# Altium PCB Стенд проверки шлейфов.PcbDoc (part 3 of 3)
Units mm, origin at the board's own origin, x right, y up, seen from the top; angles counter-clockwise.
Board outline 130 x 70 mm, 2 copper layers (Top Layer, Bottom Layer), stack 1.571 mm thick; 262 components, 230 nets, 835 pads, 564 vias.
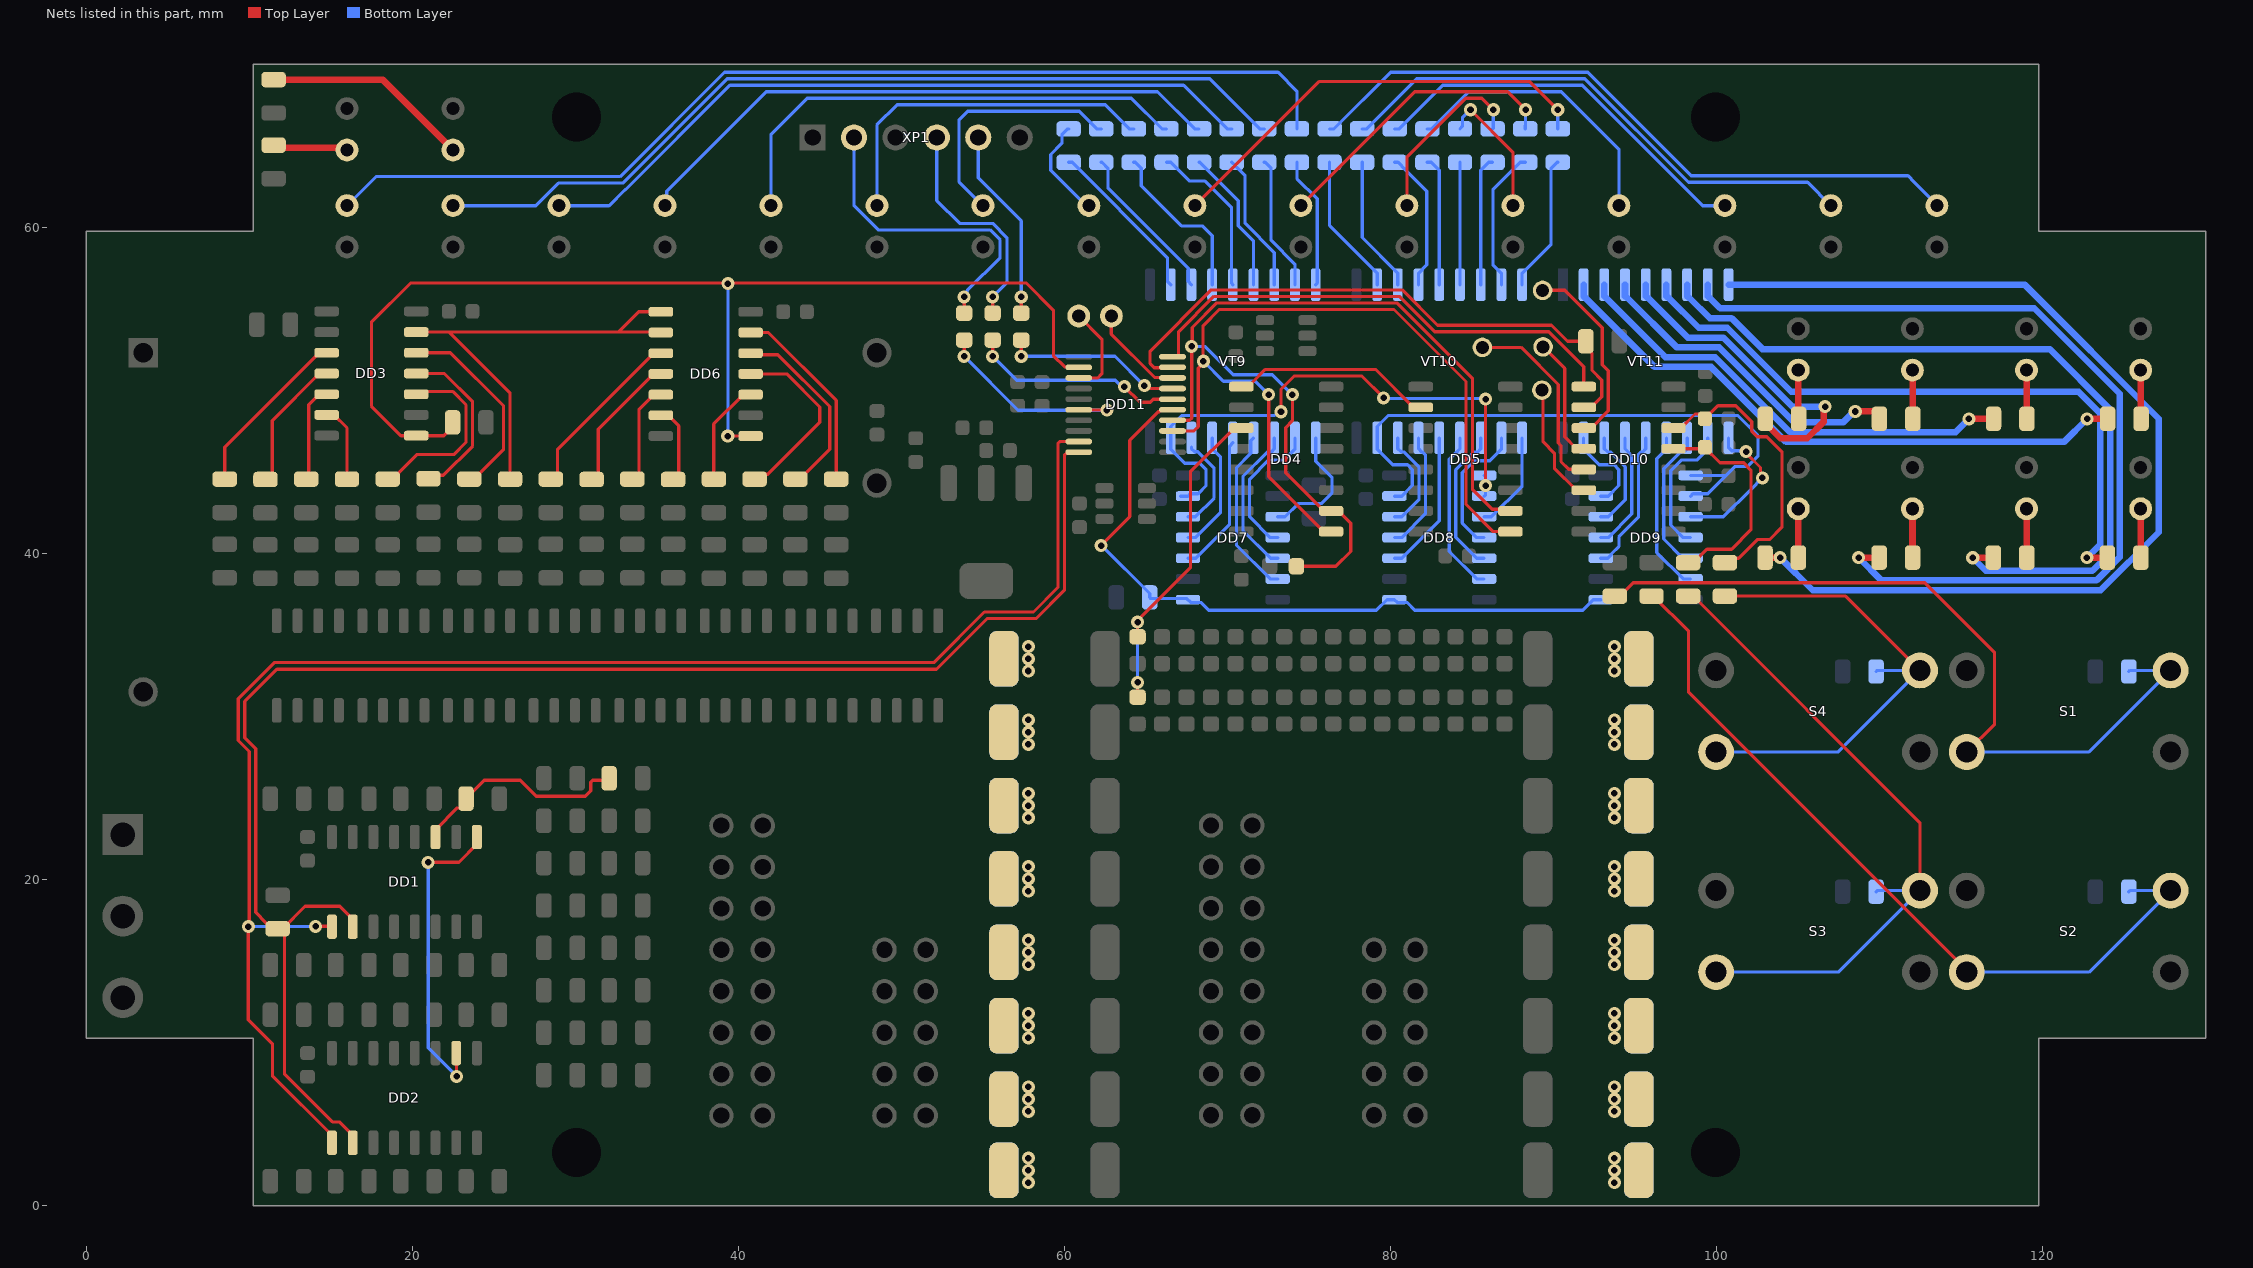
[diagram p3: the nets of this part, all layers, seen from the top]

## Via types
v1: diameter 0.8, hole 0.4, Top Layer to Bottom Layer, tented both sides, 564 vias

## Nets (pads, with @x,y where several pads share a name; then routed paths per layer and width w, separated by ;. In a path a pad name is that pad's centre, name@x,y a point inside that pad or via, vN(x,y) a via of type N, cw(c..) or ccw(c..) an arc to the next point about the centre after c; other vN are vias at no path point) (continued)
NetC19_1: C19.1 DD10.13 R167.2 | length 13.7
  Top Layer w0.2: DD10.13@97.35,46.41 99.185,46.41 C19.1@99.275,46.5 ; R167.2@98.25,39.425 98.575,39.425 99.4,40.25 100.909,40.25 102.1,41.441 102.1,45.1 101.65,45.55 100.2,45.55 C19.1@99.275,46.475
NetC20_1: C20.1 DD10.14 R168.2 | length 17.9
  Top Layer w0.2: DD10.14@97.35,47.68 97.805,47.68 98.667,48.542 98.947,48.542 99.239,48.25 C20.1@99.275,48.25 100.075,49.05 101.17,49.05 102.15,48.07 102.15,47.494 102.494,47.15 103.07,47.15 104,46.22 104,41.6 103.238,40.838 102.482,40.838 102.138,40.493 101.34,39.695 100.67,39.695 R168.2@100.5,39.525
NetDD1_9: DD1.9 DD2.10 | length 19.2
  Top Layer w0.2: v1(20.98,21.05) 22.87,21.05 23.97,22.15 DD1.9@23.97,22.6 ; DD2.10@22.7,9.35 22.713,9.338 22.713,7.937 v1(22.725,7.925)
  Bottom Layer w0.2: v1(20.98,21.05) 20.98,9.67 v1(22.725,7.925)
NetDD1_11: DD1.11 R13.2 R14.1 | length 13.6
  Top Layer w0.2: DD1.11@21.43,22.6 21.43,23.05 22.765,24.385 22.935,24.385 23.3,24.749 R14.1@23.3,24.95 24.425,26.075 26.619,26.075 27.594,25.1 30.606,25.1 30.95,25.444 30.95,25.958 31.067,26.075 31.95,26.075 R13.2@32.075,26.2
NetDD3_3: DD3.3 R42.2 | length 10.6
  Top Layer w0.2: R42.2@8.5,44.55 8.5,46.495 14.3,52.295 DD3.3@14.75,52.295
NetDD3_4: DD3.4 R38.2 | length 8.3
  Top Layer w0.2: R38.2@11,44.525 11.048,44.525 11.412,44.89 11.412,48.138 14.3,51.025 DD3.4@14.75,51.025
NetDD3_5: DD3.5 R43.2 | length 6
  Top Layer w0.2: R43.2@13.5,44.55 13.65,44.7 13.65,49.105 14.3,49.755 DD3.5@14.75,49.755
NetDD3_6: DD3.6 R39.2 | length 4.7
  Top Layer w0.2: DD3.6@14.75,48.485 15.2,48.485 16,47.685 R39.2@16,44.55
NetDD3_10: DD3.10 R44.2 | length 11.5
  Top Layer w0.2: R44.2@18.5,44.55 18.775,44.55 20.28,46.055 22.543,46.055 23.3,46.812 23.3,49.1 22.475,49.925 21.017,49.925 ; DD3.10@20.25,49.755 20.419,49.924 21.016,49.924
NetDD3_11: DD3.11 R40.2 | length 10.4
  Top Layer w0.2: DD3.11@20.25,51.025 21.975,51.025 23.7,49.3 23.7,46.575 21.905,44.78 21.205,44.78 R40.2@21,44.575
NetDD3_12: DD3.12 R45.2 | length 12.2
  Top Layer w0.2: DD3.12@20.25,52.295 22.336,52.295 25.6,49.031 25.6,46.375 23.775,44.55 R45.2@23.5,44.55
NetDD3_13: DD3.13 DD6.1 DD6.2 R41.2 | length 28.7
  Top Layer w0.2: DD3.13@20.25,53.565 22.26,53.565 ; R41.2@26,44.55 26,49.825 22.26,53.565 ; DD6.2@35.25,53.54 35.225,53.565 32.635,53.565 ; DD6.1@35.25,54.81 33.88,54.81 32.635,53.565 ; 22.26,53.565 32.635,53.565
NetDD4_9: DD4.9 DD5.10 | length 12.4
  Top Layer w0.2: DD4.9@70.85,50.22 71.273,50.22 71.5,50.447 71.5,50.45 72.325,51.275 79.075,51.275 81.4,48.95 DD5.10@81.85,48.95
NetDD4_11: DD4.11 R61.1 R64.2 | length 20.1
  Top Layer w0.2: R64.2@64.485,31.18 v1@64.485,32.03 ; R61.1@64.485,34.88 v1@64.485,35.73 ; v1@64.485,35.88 67.725,39.12 67.725,45.005 70.4,47.68 DD4.11@70.85,47.68
  Bottom Layer w0.2: v1@64.485,32.18 v1@64.485,35.88
  other v1: 64.485,32.08 64.485,35.78
NetDD6_3: DD6.3 R79.2 | length 10.8
  Top Layer w0.2: R79.2@28.5,44.55 28.548,44.55 28.912,44.915 28.912,46.382 34.8,52.27 DD6.3@35.25,52.27
NetDD6_4: DD6.4 R83.2 | length 8.5
  Top Layer w0.2: R83.2@31,44.525 31.048,44.525 31.412,44.89 31.412,47.612 34.8,51 DD6.4@35.25,51
NetDD6_5: DD6.5 R80.2 | length 6.2
  Top Layer w0.2: R80.2@33.5,44.55 33.548,44.55 33.912,44.915 33.912,48.842 34.8,49.73 DD6.5@35.25,49.73
NetDD6_6: DD6.6 R84.2 | length 4.8
  Top Layer w0.2: DD6.6@35.25,48.46 35.7,48.46 36.35,47.81 36.35,44.875 R84.2@36,44.525
NetDD6_10: DD6.10 R81.2 | length 6.4
  Top Layer w0.2: R81.2@38.5,44.55 38.5,47.93 40.3,49.73 DD6.10@40.75,49.73
NetDD6_11: DD6.11 R85.2 | length 11.5
  Top Layer w0.2: DD6.11@40.75,51 42.97,51 45,48.97 45,48.03 41.811,44.84 41.29,44.84 R85.2@41,44.55
NetDD6_12: DD6.12 R82.2 | length 11.7
  Top Layer w0.2: DD6.12@40.75,52.27 40.85,52.17 42.43,52.17 45.6,49 45.6,46.375 43.775,44.55 R82.2@43.5,44.55
NetDD6_13: DD6.13 R86.2 | length 11.8
  Top Layer w0.2: DD6.13@40.75,53.54 41.835,53.54 46,49.375 R86.2@46,44.55
NetDD7_3: DD7.3 VT9.1 | length 7.7
  Bottom Layer w0.2: DD7.3@73.075,42.235 73.525,42.235 74.339,43.049 75.755,43.049 76.4,43.694 76.4,44.656 75.405,45.651 VT9.1@75.405,47.075
NetDD7_4: DD7.4 VT9.2 | length 8.8
  Bottom Layer w0.2: DD7.4@73.075,40.965 72.625,40.965 71.35,42.24 71.35,44.55 72.525,45.725 73.485,45.725 74.135,46.375 VT9.2@74.135,47.075
NetDD7_5: DD7.5 VT9.3 | length 9.4
  Bottom Layer w0.2: VT9.3@72.865,47.075 72.865,46.402 72.669,46.206 72.44,46.206 70.95,44.716 70.95,41.385 72.64,39.695 DD7.5@73.075,39.695
NetDD7_6: DD7.6 VT9.4 | length 10.4
  Bottom Layer w0.2: VT9.4@71.595,47.075 71.426,46.906 71.426,46.126 70.55,45.25 70.55,40.5 72.625,38.425 DD7.6@73.075,38.425
NetDD7_10: DD7.10 VT9.5 | length 8.5
  Bottom Layer w0.2: DD7.10@67.575,39.695 68.045,39.695 70.125,41.775 70.125,46.575 VT9.5@70.325,46.775
NetDD7_11: DD7.11 VT9.6 | length 7.4
  Bottom Layer w0.2: DD7.11@67.575,40.965 68.025,40.965 69.575,42.515 69.575,45.882 69.055,46.402 VT9.6@69.055,47.075
NetDD7_12: DD7.12 VT9.7 | length 5.9
  Bottom Layer w0.2: DD7.12@67.575,42.235 68.025,42.235 69.175,43.385 69.175,45.225 68.178,46.222 67.981,46.222 67.785,46.418 VT9.7@67.785,46.503
NetDD7_13: DD7.13 DD8.1 DD8.2 VT9.8 | length 35.5
  Top Layer w0.2: v1(73.279,48.68) 73.279,50.054 74.095,50.87 78.23,50.87 v1(79.575,49.525) ; v1(85.825,44.15) v1(85.824,49.451)
  Bottom Layer w0.2: DD7.13@67.125,43.505 DD7.13@67.575,43.505 67.716,43.646 68.193,43.646 68.252,43.705 68.255,43.705 68.675,44.125 68.675,45.15 68.3,45.525 67.375,45.525 66.515,46.385 66.515,47.775 67.19,48.45 72.887,48.45 73.117,48.68 v1(73.279,48.68) ; v1(79.575,49.525) 79.612,49.488 85.625,49.488 85.661,49.451 v1(85.824,49.451) ; DD8.2@85.735,43.505 85.825,43.595 85.825,44.685 DD8.1@85.735,44.775
NetDD8_3: DD8.3 VT10.1 | length 6.1
  Bottom Layer w0.2: DD8.3@85.735,42.235 86.185,42.235 88.065,44.115 VT10.1@88.065,47.075
NetDD8_4: DD8.4 VT10.2 | length 8.5
  Bottom Layer w0.2: DD8.4@85.735,40.965 85.285,40.965 84.4,41.85 84.4,44.947 85.122,45.669 86.089,45.669 86.795,46.375 VT10.2@86.795,47.075
NetDD8_5: DD8.5 VT10.3 | length 9.1
  Bottom Layer w0.2: VT10.3@85.525,47.075 85.525,46.402 85.329,46.206 85.093,46.206 84,45.113 84,40.98 85.285,39.695 DD8.5@85.735,39.695
NetDD8_6: DD8.6 VT10.4 | length 10.1
  Bottom Layer w0.2: VT10.4@84.255,47.075 84.255,46.402 84.028,46.175 83.996,46.175 83.6,45.779 83.6,40.11 85.285,38.425 DD8.6@85.735,38.425
NetDD8_10: DD8.10 VT10.5 | length 8.8
  Bottom Layer w0.2: DD8.10@80.235,39.695 80.685,39.695 82.985,41.995 VT10.5@82.985,47.075
NetDD8_11: DD8.11 VT10.6 | length 7.4
  Bottom Layer w0.2: DD8.11@80.235,40.965 80.685,40.965 82.135,42.415 82.135,46.04 81.969,46.206 81.911,46.206 81.715,46.402 VT10.6@81.715,47.075
NetDD8_12: DD8.12 VT10.7 | length 6.4
  Bottom Layer w0.2: DD8.12@80.235,42.235 80.685,42.235 81.735,43.285 81.735,45.298 80.82,46.213 80.641,46.213 80.445,46.409 VT10.7@80.445,47.075
NetDD8_13: DD8.13 DD9.1 DD9.2 VT10.8 | length 39.2
  Bottom Layer w0.2: DD8.13@80.235,43.505 80.685,43.505 81.335,44.155 81.335,45.132 81.042,45.425 80.125,45.425 79.175,46.375 VT10.8@79.175,47.075 79.175,47.775 79.85,48.45 101.3,48.45 102.525,47.225 102.525,45.95 101.9,45.325 101.122,45.325 100.572,44.775 ; DD9.2@98.395,43.505 98.538,43.648 99.445,43.648 100.572,44.775 ; DD9.1@98.395,44.775 100.572,44.775
NetDD9_3: DD9.3 VT11.1 | length 9.2
  Top Layer w0.2: v1(101.8,46.234) 101.8,46.147 102.685,45.262 102.685,44.74 v1(102.8,44.626)
  Bottom Layer w0.2: DD9.3@98.395,42.235 100.409,42.235 102.079,43.904 v1(102.8,44.626) ; VT11.1@100.725,47.075 100.725,46.476 100.921,46.279 101.754,46.279 v1(101.8,46.234)
NetDD9_4: DD9.4 VT11.2 | length 8.4
  Bottom Layer w0.2: DD9.4@98.395,40.965 97.945,40.965 97.175,41.735 97.175,45.054 97.846,45.725 98.805,45.725 99.455,46.375 VT11.2@99.455,47.075
NetDD9_5: DD9.5 VT11.3 | length 9.1
  Bottom Layer w0.2: VT11.3@98.185,47.075 98.185,46.402 97.989,46.206 97.856,46.206 97.85,46.2 97.755,46.2 96.75,45.195 96.75,40.875 97.93,39.695 DD9.5@98.395,39.695
NetDD9_6: DD9.6 VT11.4 | length 10
  Bottom Layer w0.2: VT11.4@96.915,47.075 96.915,46.39 96.325,45.8 96.325,40.045 97.945,38.425 DD9.6@98.395,38.425
NetDD9_10: DD9.10 VT11.5 | length 8.8
  Bottom Layer w0.2: DD9.10@92.895,39.695 93.318,39.695 93.545,39.922 93.545,39.954 94,40.409 94,41 95.2,42.2 95.2,46.058 95.348,46.206 95.449,46.206 95.645,46.402 VT11.5@95.645,47.075
NetDD9_11: DD9.11 VT11.6 | length 7.3
  Bottom Layer w0.2: DD9.11@92.895,40.965 93.345,40.965 94.795,42.415 94.795,45.98 94.375,46.4 VT11.6@94.375,47.075
NetDD9_12: DD9.12 VT11.7 | length 6.4
  Bottom Layer w0.2: DD9.12@92.895,42.235 93.345,42.235 94.395,43.285 94.395,45.298 93.48,46.213 93.301,46.213 93.105,46.409 VT11.7@93.105,47.075
NetDD9_13: DD9.13 VT11.8 | length 5.7
  Bottom Layer w0.2: VT11.8@91.835,47.075 91.835,46.375 92.785,45.425 93.702,45.425 93.995,45.132 93.995,44.155 93.345,43.505 DD9.13@92.895,43.505
NetDD10_3: DD10.3 X6.1 | length 11.8
  Top Layer w0.2: X6.1@89.325,56.125 90.675,56.125 92.975,53.825 92.975,51.568 93.35,51.193 93.35,48.73 92.3,47.68 DD10.3@91.85,47.68
NetDD10_4: DD10.4 X7.1 | length 7.5
  Top Layer w0.2: X7.1@89.35,52.66 90.675,51.335 90.675,47.135 91.4,46.41 DD10.4@91.85,46.41
NetDD10_5: DD10.5 X8.1 | length 12
  Top Layer w0.2: X8.1@85.625,52.625 88,52.625 90.275,50.35 90.275,46.775 90.45,46.6 90.45,45.625 90.917,45.158 91.832,45.158 DD10.5@91.85,45.14
NetDD10_6: DD10.6 X9.1 | length 7.5
  Top Layer w0.2: X9.1@89.275,50 89.35,49.925 89.35,46.834 90.05,46.134 90.05,45.22 91.4,43.87 DD10.6@91.85,43.87
NetDD11_3: DD11.3 X10.1 | length 5.7
  Top Layer w0.2: DD11.3@60.875,50.75 62.05,50.75 62.3,51 62.3,53.125 X10.1@60.875,54.55
NetDD11_18: DD11.18 X11.1 | length 6
  Top Layer w0.2: X11.1@62.875,54.55 62.875,53.441 65.537,50.779 66.596,50.779 DD11.18@66.625,50.75
NetHL1_1: HL1.1 R133.2 | length 64.4
  Bottom Layer w0.2: HL1.1@16,61.32 17.78,63.1 32.75,63.1 39.15,69.5 73.1,69.5 74.255,68.345 R133.2@74.255,66.025
NetHL2_1: HL2.1 R134.2 | length 54.3
  Bottom Layer w0.2: HL2.1@22.5,61.32 27.586,61.32 28.966,62.7 32.916,62.7 39.316,69.1 68.905,69.1 71.98,66.025 R134.2@72.255,66.025
NetHL3_1: HL3.1 R135.2 | length 45.4
  Bottom Layer w0.2: HL3.1@29,61.32 32.07,61.32 33.05,62.3 33.081,62.3 39.481,68.7 67.305,68.7 69.98,66.025 R135.2@70.255,66.025
NetHL4_1: HL4.1 R136.2 | length 37
  Bottom Layer w0.2: HL4.1@35.5,61.32 35.603,61.423 35.603,62.203 41.7,68.3 65.705,68.3 67.98,66.025 R136.2@68.255,66.025
NetHL5_1: HL5.1 R137.2 | length 30.3
  Bottom Layer w0.2: HL5.1@42,61.32 42,65.675 44.225,67.9 64.105,67.9 65.98,66.025 R137.2@66.255,66.025
NetHL6_1: HL6.1 R138.2 | length 21.8
  Bottom Layer w0.2: HL6.1@48.5,61.32 48.5,66.266 49.734,67.5 62.505,67.5 63.98,66.025 R138.2@64.255,66.025
NetHL7_1: HL7.1 R139.2 | length 15.2
  Bottom Layer w0.2: HL7.1@55,61.32 53.525,62.795 53.525,66.557 54.068,67.1 60.905,67.1 61.98,66.025 R139.2@62.255,66.025
NetHL8_1: HL8.1 R140.2 | length 6.3
  Bottom Layer w0.2: R140.2@60.255,66.025 60.207,66.025 59.842,65.66 59.842,65.143 59.155,64.456 59.155,63.494 61.329,61.32 HL8.1@61.5,61.32
NetHL9_1: HL9.1 R141.2 | length 27.3
  Top Layer w0.2: HL9.1@68,61.32 75.605,68.925 88.525,68.925 v1(90.25,67.2)
  Bottom Layer w0.2: v1(90.25,67.2) 90.25,66.03 R141.2@90.255,66.025
NetHL10_1: HL10.1 R142.2 | length 18.3
  Top Layer w0.2: HL10.1@74.5,61.32 81.48,68.3 87.175,68.3 v1(88.275,67.2)
  Bottom Layer w0.2: R142.2@88.255,66.025 88.255,66.23 88.275,66.25 v1(88.275,67.2)
NetHL11_1: HL11.1 R143.2 | length 11.2
  Top Layer w0.2: HL11.1@81,61.32 81,64.29 84.61,67.9 85.6,67.9 v1(86.3,67.2)
  Bottom Layer w0.2: R143.2@86.255,66.025 86.3,66.07 v1(86.3,67.2)
NetHL12_1: HL12.1 R144.2 | length 8.4
  Top Layer w0.2: v1(84.9,67.2) 87.5,64.6 HL12.1@87.5,61.32
  Bottom Layer w0.2: R144.2@84.255,66.025 84.405,66.175 84.405,66.705 v1(84.9,67.2)
NetHL13_1: HL13.1 R145.2 | length 17.6
  Bottom Layer w0.2: R145.2@82.255,66.025 82.53,66.025 84.805,68.3 90.475,68.3 94,64.775 HL13.1@94,61.32
NetHL14_1: HL14.1 R146.2 | length 24.4
  Bottom Layer w0.2: R146.2@80.255,66.025 80.53,66.025 83.205,68.7 91.752,68.7 99.132,61.32 HL14.1@100.5,61.32
NetHL15_1: HL15.1 R147.2 | length 33.2
  Bottom Layer w0.2: R147.2@78.255,66.025 78.53,66.025 81.605,69.1 91.918,69.1 98.268,62.75 105.57,62.75 HL15.1@107,61.32
NetHL16_1: HL16.1 R148.2 | length 42.1
  Bottom Layer w0.2: R148.2@76.255,66.025 76.53,66.025 80.005,69.5 92.084,69.5 98.434,63.15 111.734,63.15 112.126,62.758 113.5,61.384 HL16.1@113.5,61.32
NetHL17_1: HL17.1 R149.2 | length 3
  Top Layer w0.4: HL17.1@105,42.73 105.006,42.724 105.006,39.744 R149.2@105.013,39.737
NetHL18_1: HL18.1 R150.2 | length 3
  Top Layer w0.4: HL18.1@112,42.73 112.006,42.724 112.006,39.744 R150.2@112.012,39.737
NetHL19_1: HL19.1 R151.2 | length 3
  Top Layer w0.4: HL19.1@119,42.73 119.006,42.724 119.006,39.744 R151.2@119.013,39.737
NetHL20_1: HL20.1 R152.2 | length 3
  Top Layer w0.4: HL20.1@126,42.73 126.006,42.724 126.006,39.744 R152.2@126.012,39.737
NetHL21_1: HL21.1 R153.2 | length 3
  Top Layer w0.4: HL21.1@105,51.23 105.013,51.217 105.013,48.262 R153.2@105.025,48.25
NetHL22_1: HL22.1 R154.2 | length 3
  Top Layer w0.4: HL22.1@112,51.23 112.012,51.217 112.012,48.263 R154.2@112.025,48.25
NetHL23_1: HL23.1 R155.2 | length 3
  Top Layer w0.4: R155.2@119,48.275 HL23.1@119,51.23
NetHL24_1: HL24.1 R156.2 | length 3
  Top Layer w0.4: HL24.1@126,51.23 126.012,51.217 126.012,48.262 R156.2@126.025,48.25
NetHL25_2: HL25.2 R157.2 | length 4.6
  Top Layer w0.3: R157.2@11.5,65.025 R157.2@11.648,64.877 ; HL25.2@15.853,64.877 HL25.2@16,64.73
  Top Layer w0.4: R157.2@11.648,64.877 HL25.2@15.853,64.877
NetHL26_2: HL26.2 R158.2 | length 12.8
  Top Layer w0.4: R158.2@11.5,69.05 18.18,69.05 HL26.2@22.5,64.73
NetR65_2: R65.2 R66.1
  other v1: 93.725,5.78 93.725,6.53 93.725,7.28
NetR67_2: R67.2 R68.1
  other v1: 93.725,1.405 93.725,2.155 93.725,2.905
NetR69_2: R69.2 R70.1
  other v1: 93.725,14.78 93.725,15.53 93.725,16.28
NetR87_2: R87.2 R88.1
  other v1: 93.725,10.28 93.725,11.03 93.725,11.78
NetR89_2: R89.2 R90.1
  other v1: 93.725,23.78 93.725,24.53 93.725,25.28
NetR91_2: R91.2 R92.1
  other v1: 93.725,19.28 93.725,20.03 93.725,20.78
NetR103_2: R103.2 R104.1
  other v1: 93.725,32.78 93.725,33.53 93.725,34.28
NetR105_2: R105.2 R106.1
  other v1: 93.725,28.28 93.725,29.03 93.725,29.78
NetR107_2: R107.2 R108.1
  other v1: 57.785,1.405 57.785,2.155 57.785,2.905
NetR109_2: R109.2 R110.1
  other v1: 57.785,5.78 57.785,6.53 57.785,7.28
NetR111_2: R111.2 R112.1
  other v1: 57.785,10.28 57.785,11.03 57.785,11.78
NetR123_2: R123.2 R124.1
  other v1: 57.785,14.78 57.785,15.53 57.785,16.28
NetR125_2: R125.2 R126.1
  other v1: 57.785,19.28 57.785,20.03 57.785,20.78
NetR127_2: R127.2 R128.1
  other v1: 57.785,23.78 57.785,24.53 57.785,25.28
NetR129_2: R129.2 R130.1
  other v1: 57.785,28.28 57.785,29.03 57.785,29.78
NetR131_2: R131.2 R132.1
  other v1: 57.785,32.78 57.785,33.53 57.785,34.28
NetR133_1: R133.1 VT9.18 | length 8.1
  Bottom Layer w0.2: R133.1@74.255,63.975 74.255,62.979 75.5,61.734 75.5,56.57 VT9.18@75.405,56.475
NetR134_1: R134.1 VT9.17 | length 8.3
  Bottom Layer w0.2: R134.1@72.255,63.975 72.303,63.975 72.667,63.61 72.667,59.198 74.135,57.731 VT9.17@74.135,56.475
NetR135_1: R135.1 VT9.16 | length 8.6
  Bottom Layer w0.2: R135.1@70.255,63.975 71.075,63.155 71.075,60.225 72.865,58.435 VT9.16@72.865,56.475
NetR136_1: R136.1 VT9.15 | length 8.9
  Bottom Layer w0.2: R136.1@68.255,63.975 68.303,63.975 70.65,61.628 70.65,60.084 71.595,59.139 VT9.15@71.595,56.475
NetR137_1: R137.1 VT9.14 | length 9.9
  Bottom Layer w0.2: R137.1@66.255,63.975 66.53,63.975 67.68,62.825 68.625,62.825 70.25,61.2 70.25,56.55 VT9.14@70.325,56.475
NetR138_1: R138.1 VT9.13 | length 10.3
  Bottom Layer w0.2: R138.1@64.255,63.975 64.341,63.975 64.706,63.61 64.706,62.544 67.175,60.075 68.45,60.075 69.055,59.47 VT9.13@69.055,56.475
NetR139_1: R139.1 VT9.12 | length 9.8
  Bottom Layer w0.2: R139.1@62.255,63.975 62.303,63.975 62.667,63.61 62.667,62.408 67.585,57.49 67.585,56.675 VT9.12@67.785,56.475
NetR140_1: R140.1 VT9.11 | length 10.2
  Bottom Layer w0.2: R140.1@60.255,63.975 60.475,63.975 66.315,58.135 66.315,56.675 VT9.11@66.515,56.475
NetR141_1: R141.1 VT10.18 | length 8.4
  Bottom Layer w0.2: VT10.18@88.065,56.475 88.065,57.175 89.843,58.953 89.843,63.61 90.207,63.975 R141.1@90.255,63.975
NetR142_1: R142.1 VT10.17 | length 8.7
  Bottom Layer w0.2: VT10.17@86.795,56.475 86.795,57.175 86.275,57.695 86.275,62.3 87.95,63.975 R142.1@88.255,63.975
NetR143_1: R143.1 VT10.16 | length 7.9
  Bottom Layer w0.2: VT10.16@85.525,56.475 85.525,63.483 86.017,63.975 R143.1@86.255,63.975
NetR144_1: R144.1 VT10.15 | length 7.5
  Bottom Layer w0.2: VT10.15@84.255,56.475 R144.1@84.255,63.975
NetR145_1: R145.1 VT10.14 | length 7.9
  Bottom Layer w0.2: R145.1@82.255,63.975 82.493,63.975 82.985,63.483 VT10.14@82.985,56.475
NetR146_1: R146.1 VT10.13 | length 8.6
  Bottom Layer w0.2: R146.1@80.255,63.975 80.456,63.975 80.905,63.526 82.225,62.206 82.225,57.685 81.715,57.175 VT10.13@81.715,56.475
NetR147_1: R147.1 VT10.12 | length 8.4
  Bottom Layer w0.2: R147.1@78.255,63.975 78.255,59.365 80.445,57.175 VT10.12@80.445,56.475
NetR148_1: R148.1 VT10.11 | length 8.7
  Bottom Layer w0.2: R148.1@76.255,63.975 76.255,60.095 79.175,57.175 VT10.11@79.175,56.475
NetR149_1: R149.1 VT11.18 | length 63.2
  Top Layer w0.4: R149.1@102.963,39.737 v1(103.887,39.737)
  Bottom Layer w0.4: VT11.18@100.725,56.475 118.875,56.475 127.1,48.25 127.1,41.297 123.535,37.731 105.894,37.731 v1(103.887,39.737)
NetR150_1: R150.1 VT11.17 | length 56.9
  Top Layer w0.4: v1(108.706,39.731) 108.712,39.737 R150.1@109.963,39.737
  Bottom Layer w0.4: VT11.17@99.455,56.475 99.455,55.775 100.205,55.025 119.476,55.025 124.719,49.783 124.719,39.764 123.286,38.331 110.106,38.331 v1(108.706,39.731)
NetR151_1: R151.1 VT11.16 | length 48.8
  Top Layer w0.4: v1(115.7,39.725) 115.706,39.731 116.956,39.731 R151.1@116.963,39.737
  Bottom Layer w0.4: VT11.16@98.185,56.475 98.185,55.775 98.285,55.675 98.319,55.675 99.569,54.425 100.9,54.425 102.8,52.525 120.417,52.525 124.119,48.824 124.119,40.012 123.038,38.931 116.494,38.931 v1(115.7,39.725)
NetR152_1: R152.1 VT11.15 | length 40.7
  Top Layer w0.4: v1(122.706,39.731) 122.712,39.737 R152.1@123.963,39.737
  Bottom Layer w0.4: VT11.15@96.915,56.475 96.915,55.775 97.015,55.675 97.049,55.675 98.899,53.825 100.651,53.825 104.576,49.9 122.194,49.9 123.519,48.575 123.519,40.544 v1(122.706,39.731)
NetR153_1: R153.1 VT11.14 | length 20.1
  Top Layer w0.4: R153.1@102.975,48.25 102.975,47.975 103.9,47.05 105.547,47.05 106.573,48.076 106.573,48.923 v1(106.65,49)
  Bottom Layer w0.4: VT11.14@95.645,56.475 95.645,55.775 95.745,55.675 95.779,55.675 98.229,53.225 100.4,53.225 104.625,49 v1(106.65,49)
NetR154_1: R154.1 VT11.13 | length 19.6
  Top Layer w0.4: v1(108.494,48.694) 108.5,48.7 R154.1@109.75,48.7
  Bottom Layer w0.4: VT11.13@94.375,56.475 94.375,55.775 94.475,55.675 94.509,55.675 97.559,52.625 100.15,52.625 104.75,48.025 107.748,48.025 108.417,48.694 v1(108.494,48.694)
NetR155_1: R155.1 VT11.12 | length 28.1
  Top Layer w0.4: v1(115.469,48.244) 115.475,48.25 R155.1@116.725,48.25
  Bottom Layer w0.4: VT11.12@93.105,56.475 93.105,55.775 96.855,52.025 99.901,52.025 102.676,49.251 104.501,47.425 114.65,47.425 v1(115.469,48.244)
NetR156_1: R156.1 VT11.11 | length 37.1
  Top Layer w0.4: v1(122.719,48.244) 122.725,48.25 R156.1@123.975,48.25
  Bottom Layer w0.4: VT11.11@91.835,56.475 91.835,55.775 96.185,51.425 99.653,51.425 104.253,46.825 121.3,46.825 v1(122.719,48.244)
NetR162_1: R162.1 XP1.2 | length 19.4
  Top Layer w0.2: R162.1@53.85,54.725 v1(53.85,55.725)
  Bottom Layer w0.2: XP1.2@47.095,65.5 47.095,61.311 48.576,59.83 55.435,59.83 56.05,59.215 56.05,58.125 54.045,56.12 54.045,56.082 53.85,55.887 v1(53.85,55.725)
NetR163_1: R163.1 XP1.5 | length 11.9
  Top Layer w0.2: R163.1@57.35,54.725 v1(57.35,55.725)
  Bottom Layer w0.2: XP1.5@54.715,65.5 54.715,63.019 57.35,60.384 v1(57.35,55.725)
NetR164_1: R164.1 XP1.4 | length 14.1
  Top Layer w0.2: R164.1@55.6,54.725 v1(55.6,55.725)
  Bottom Layer w0.2: XP1.4@52.175,65.5 52.175,61.63 53.575,60.23 55.601,60.23 56.47,59.36 56.47,56.595 v1(55.6,55.725)
NetR165_1: R165.1 R169.2 S1.1 S1.4 | length 49.4
  Top Layer w0.2: R165.1@93.75,37.375 94.05,37.375 94.875,38.2 112.75,38.2 117.038,33.913 117.038,29.52 S1.4@115.333,27.815
  Bottom Layer w0.2: S1.4@115.333,27.815 122.833,27.815 S1.1@127.833,32.815 125.34,32.815 R169.2@125.275,32.75
NetR166_1: R166.1 R170.2 S2.1 S2.4 | length 48.3
  Top Layer w0.2: R166.1@96,37.375 96.11,37.375 98.275,35.21 98.275,31.484 115.333,14.426 S2.1@115.333,14.315
  Bottom Layer w0.2: S2.1@115.333,14.315 122.833,14.315 S2.4@127.833,19.315 125.34,19.315 R170.2@125.275,19.25
NetR167_1: R167.1 R171.2 S3.1 S3.4 | length 41.4
  Top Layer w0.2: R167.1@98.25,37.375 98.575,37.375 112.464,23.486 S3.1@112.464,19.315
  Bottom Layer w0.2: S3.4@99.964,14.315 107.464,14.315 S3.1@112.464,19.315 109.84,19.315 R171.2@109.775,19.25
NetR168_1: R168.1 R172.2 S4.1 S4.4 | length 31.1
  Top Layer w0.2: R168.1@100.5,37.375 107.904,37.375 S4.1@112.464,32.815
  Bottom Layer w0.2: S4.4@99.964,27.815 107.464,27.815 S4.1@112.464,32.815 109.84,32.815 R172.2@109.775,32.75
NRST: DD11.6 R162.2 | length 12.9
  Top Layer w0.2: v1(53.85,52.075) R162.2@53.85,53.075 ; DD11.6@60.875,48.8 60.887,48.787 62.587,48.787 v1(62.6,48.775)
  Bottom Layer w0.2: v1(53.85,52.075) 57.15,48.775 v1(62.6,48.775)
SCL_164: DD3.8 DD6.8 DD11.2 R57.2 | length 70.3
  Top Layer w0.2: R57.2@22.475,48.025 22.475,47.75 21.94,47.215 DD3.8@20.25,47.215 19.31,47.215 17.5,49.025 17.5,54.175 19.9,56.575 39.325,56.575 v1(39.363,56.538) 39.4,56.575 57.65,56.575 59.325,54.9 59.325,52.125 60.021,51.429 60.846,51.429 DD11.2@60.875,51.4 ; v1(39.35,47.19) DD6.8@40.75,47.19
  Bottom Layer w0.2: v1(39.35,47.19) 39.363,47.202 v1(39.363,56.538)
SCL_165_1: DD1.2 DD2.2 DD11.10 R37.2 | length 98.5
  Top Layer w0.2: 11.025,17.35 10.4,17.975 10.4,28.01 9.725,28.685 9.725,30.916 10.4,31.591 11.701,32.892 52.151,32.892 55.259,36 58.266,36 60,37.734 60,46.008 60.192,46.2 DD11.10@60.875,46.2 ; 11.026,17.35 11.401,16.975 R37.2@11.798,16.975 ; DD2.2@16.35,3.85 16.35,4.3 15.525,5.125 15.11,5.125 12.163,8.072 12.163,16.61 R37.2@11.798,16.975 ; DD1.2@16.35,17.1 16.35,17.55 15.55,18.35 13.425,18.35 12.05,16.975 R37.2@11.798,16.975
SCL_165_2: DD4.2 DD5.2 DD11.14 R52.2 | length 59.3
  Top Layer w0.2: DD11.14@66.625,48.15 67.658,48.15 67.8,48.292 v1(67.8,52.686) ; v1@67.829,52.686 67.829,53.845 69.334,55.35 80.375,55.35 85.025,50.7 85.025,43.9 86.232,42.693 87.257,42.693 DD5.2@87.35,42.6 ; v1(73.979,49.725) 73.979,48.114 73.575,47.71 73.575,44.925 75.9,42.6 76.8,42.6 77.55,41.85 77.55,40.11 76.64,39.2 R52.2@74.225,39.2
  Bottom Layer w0.2: v1(67.8,52.686) 68.604,52.686 70.34,50.95 72.754,50.95 v1(73.979,49.725)
SCL_165_KEY: DD10.2 DD11.19 R161.2 | length 37
  Top Layer w0.2: DD11.19@66.625,51.4 66.6,51.375 65.506,51.375 65.25,51.631 65.25,52.398 69.002,56.15 80.706,56.15 82.876,53.98 89.868,53.98 90.848,53 R161.2@91.975,53 91.975,52.651 92.35,52.276 92.35,51.224 92.95,50.624 92.95,49.6 92.3,48.95 DD10.2@91.85,48.95
SCL_LED: DD7.8 DD8.8 DD9.8 DD11.15 R159.2 | length 43.8
  Top Layer w0.2: v1@62.25,40.5 64.004,42.254 64.004,46.921 65.758,48.675 65.809,48.675 65.934,48.8 DD11.15@66.625,48.8
  Bottom Layer w0.2: v1(62.25,40.475) 62.282,40.475 65.225,37.533 R159.2@65.225,37.29 65.293,37.222 67.508,37.222 67.744,36.986 68.364,36.986 68.845,36.505 79.13,36.505 79.78,37.155 DD8.8@80.235,37.155 80.404,36.986 81.005,36.986 81.486,36.505 91.78,36.505 92.43,37.155 DD9.8@92.895,37.155
SH/L\D\_1: DD1.1 DD2.1 DD11.9 | length 98.3
  Top Layer w0.2: v1(14.075,17.125) 14.884,17.125 15.08,17.321 DD1.1@15.08,17.523 ; DD2.1@15.08,3.85 15.08,4.3 11.425,7.955 11.425,9.925 9.95,11.4 v1(9.95,17.1) 10,17.15 10,27.844 9.325,28.519 9.325,31.081 11.544,33.3 51.994,33.3 55.094,36.4 58.1,36.4 59.6,37.9 59.6,46.733 59.717,46.85 DD11.9@60.875,46.85
  Bottom Layer w0.2: v1(9.95,17.1) 9.963,17.113 14.062,17.113 v1(14.075,17.125)
SH/L\D\_2: DD4.1 DD5.1 DD11.13 | length 52.4
  Top Layer w0.2: DD11.13@66.625,47.5 67.931,47.5 68.2,47.769 68.2,51.358 68.525,51.683 v1(68.525,51.775) 68.5,51.8 68.5,53.951 69.499,54.95 80.209,54.95 84.625,50.534 84.625,43.005 86.3,41.33 DD5.1@87.35,41.33 ; v1(72.525,49.725) 72.525,44.705 75.9,41.33 DD4.1@76.35,41.33
  Bottom Layer w0.2: v1(68.525,51.775) 69.75,50.55 71.7,50.55 v1(72.525,49.725)
SH/L\D\_KEY: DD10.1 DD11.20 | length 30.6
  Top Layer w0.2: DD11.20@66.625,52.05 66.931,52.05 67,52.119 67,53.582 69.168,55.75 80.541,55.75 82.711,53.58 89.703,53.58 91.85,51.433 DD10.1@91.85,50.22
SWCLK: DD11.16 R164.2 | length 13.3
  Top Layer w0.2: v1(55.6,52.075) R164.2@55.6,53.075 ; v1(63.675,50.225) 64.634,49.266 65.266,49.266 65.451,49.45 DD11.16@66.625,49.45
  Bottom Layer w0.2: v1(55.6,52.075) 57.062,50.613 63.125,50.613 63.513,50.225 v1(63.675,50.225)
SWDIO: DD11.17 R163.2 | length 11.1
  Top Layer w0.2: v1(57.35,52.075) R163.2@57.35,53.075 ; v1(64.9,50.275) 65.062,50.275 65.237,50.1 DD11.17@66.625,50.1
  Bottom Layer w0.2: v1(57.35,52.075) 63.1,52.075 v1(64.9,50.275)
pads on no net: DD1.7 DD2.7 DD4.7 DD5.7 DD10.7 S1.3 S2.3 S3.3 S4.3 X5.2 XP1.3

## Polygon pours and split planes (outlines as drawn)
GND on Top Layer "NONET_L01_P-001" (solid, remove dead copper, pour order 34): 10.253,0 10.253,70 130,70 130,0
5V on Top Layer "NONET_L01_P-001" (solid, remove dead copper, pour order 28): 47.525,38.25 47.525,39.55 47.05,40.025 47.05,46.05 51.325,46.05 51.325,42.775 51.325,37.425 48.35,37.425
3.3V on Top Layer "NONET_L01_P-001" (solid, remove dead copper, pour order 26): 52.675,36.7 52.675,44.45 57.525,44.45 57.525,36.7
15_OUT on Top Layer "NONET_L01_P-001" (solid, remove dead copper, pour order 24): 50.685,30.5 52.555,30.5 52.555,28.575 50.685,28.575
11_OUT on Top Layer "NONET_L01_P-001" (solid, remove dead copper, pour order 20): 40.185,30.5 42.055,30.5 42.055,28.575 40.185,28.575
12_OUT on Top Layer "NONET_L01_P-001" (solid, remove dead copper, pour order 21): 42.895,30.5 44.765,30.5 44.765,28.575 42.895,28.575
13_OUT on Top Layer "NONET_L01_P-001" (solid, remove dead copper, pour order 22): 45.435,30.5 47.305,30.5 47.305,28.575 45.435,28.575
14_OUT on Top Layer "NONET_L01_P-001" (solid, remove dead copper, pour order 23): 48.145,30.5 50.015,30.5 50.015,28.575 48.145,28.575
9_OUT on Top Layer "NONET_L01_P-001" (solid, remove dead copper, pour order 18): 34.935,30.5 36.805,30.5 36.805,28.575 34.935,28.575
0_OUT on Top Layer "NONET_L01_P-001" (solid, remove dead copper, pour order 1): 11.395,30.5 13.265,30.5 13.265,28.575 11.395,28.575
1_OUT on Top Layer "NONET_L01_P-001" (solid, remove dead copper, pour order 10): 13.935,30.5 15.805,30.5 15.805,28.575 13.935,28.575
2_OUT on Top Layer "NONET_L01_P-001" (solid, remove dead copper, pour order 11): 16.645,30.5 18.515,30.5 18.515,28.575 16.645,28.575
3_OUT on Top Layer "NONET_L01_P-001" (solid, remove dead copper, pour order 12): 19.185,30.5 21.055,30.5 21.055,28.575 19.185,28.575
4_OUT on Top Layer "NONET_L01_P-001" (solid, remove dead copper, pour order 13): 21.895,30.5 23.765,30.5 23.765,28.575 21.895,28.575
5_OUT on Top Layer "NONET_L01_P-001" (solid, remove dead copper, pour order 14): 24.435,30.5 26.305,30.5 26.305,28.575 24.435,28.575
6_OUT on Top Layer "NONET_L01_P-001" (solid, remove dead copper, pour order 15): 27.145,30.5 29.015,30.5 29.015,28.575 27.145,28.575
7_OUT on Top Layer "NONET_L01_P-001" (solid, remove dead copper, pour order 16): 29.685,30.5 31.555,30.5 31.555,28.575 29.685,28.575
8_OUT on Top Layer "NONET_L01_P-001" (solid, remove dead copper, pour order 17): 32.395,30.5 34.265,30.5 34.265,28.575 32.395,28.575
10_OUT on Top Layer "NONET_L01_P-001" (solid, remove dead copper, pour order 19): 37.645,30.5 39.515,30.5 39.515,28.575 37.645,28.575
GND on Bottom Layer "NONET_L01_P-001" (solid, remove dead copper, pour order 33): 10.253,0 10.253,70 130,70 130,0

## Other copper
Top Layer:
  rectangle net GND: 89.025,32.35 91.11,34.7
  rectangle net GND: 89.025,27.85 91.11,30.2
  rectangle net GND: 89.025,23.35 91.11,25.7
  rectangle net GND: 89.025,18.85 91.11,21.2
  rectangle net GND: 89.025,14.35 91.11,16.7
  rectangle net GND: 89.025,9.85 91.11,12.2
  rectangle net GND: 89.025,5.35 91.11,7.7
  rectangle net GND: 89.025,0.975 91.11,3.325
  region net GND: 62.485,3.325 60.4,3.325 60.4,0.975 62.485,0.975
  region net GND: 62.485,7.7 60.4,7.7 60.4,5.35 62.485,5.35
  region net GND: 62.485,12.2 60.4,12.2 60.4,9.85 62.485,9.85
  region net GND: 62.485,16.7 60.4,16.7 60.4,14.35 62.485,14.35
  region net GND: 62.485,21.2 60.4,21.2 60.4,18.85 62.485,18.85
  region net GND: 62.485,25.7 60.4,25.7 60.4,23.35 62.485,23.35
  region net GND: 62.485,30.2 60.4,30.2 60.4,27.85 62.485,27.85
  region net GND: 62.485,34.7 60.4,34.7 60.4,32.35 62.485,32.35
  region net NetR103_2: 95.225,34.7 93.14,34.7 93.14,32.35 95.225,32.35
  region net NetR105_2: 95.225,30.2 93.14,30.2 93.14,27.85 95.225,27.85
  region net NetR89_2: 95.225,25.7 93.14,25.7 93.14,23.35 95.225,23.35
  region net NetR91_2: 95.225,21.2 93.14,21.2 93.14,18.85 95.225,18.85
  region net NetR69_2: 95.225,16.7 93.14,16.7 93.14,14.35 95.225,14.35
  region net NetR87_2: 95.225,12.2 93.14,12.2 93.14,9.85 95.225,9.85
  region net NetR65_2: 95.225,7.7 93.14,7.7 93.14,5.35 95.225,5.35
  region net NetR67_2: 95.225,3.325 93.14,3.325 93.14,0.975 95.225,0.975
  rectangle net NetR107_2: 56.285,0.985 58.37,3.335
  rectangle net NetR109_2: 56.285,5.36 58.37,7.71
  rectangle net NetR111_2: 56.285,9.86 58.37,12.21
  rectangle net NetR123_2: 56.285,14.36 58.37,16.71
  rectangle net NetR125_2: 56.285,18.86 58.37,21.21
  rectangle net NetR127_2: 56.285,23.36 58.37,25.71
  rectangle net NetR129_2: 56.285,27.86 58.37,30.21
  rectangle net NetR131_2: 56.285,32.36 58.37,34.71
Bottom Layer:
  region net NetR67_2: 95.225,3.325 93.14,3.325 93.14,0.975 95.225,0.975
  rectangle net NetR107_2: 56.285,0.985 58.37,3.335
  region net NetR103_2: 95.225,34.7 93.14,34.7 93.14,32.35 95.225,32.35
  region net NetR105_2: 95.225,30.2 93.14,30.2 93.14,27.85 95.225,27.85
  region net NetR89_2: 95.225,25.7 93.14,25.7 93.14,23.35 95.225,23.35
  region net NetR91_2: 95.225,21.2 93.14,21.2 93.14,18.85 95.225,18.85
  region net NetR69_2: 95.225,16.7 93.14,16.7 93.14,14.35 95.225,14.35
  region net NetR87_2: 95.225,12.2 93.14,12.2 93.14,9.85 95.225,9.85
  region net NetR65_2: 95.225,7.7 93.14,7.7 93.14,5.35 95.225,5.35
  rectangle net NetR109_2: 56.285,5.36 58.37,7.71
  rectangle net NetR111_2: 56.285,9.86 58.37,12.21
  rectangle net NetR123_2: 56.285,14.36 58.37,16.71
  rectangle net NetR125_2: 56.285,18.86 58.37,21.21
  rectangle net NetR127_2: 56.285,23.36 58.37,25.71
  rectangle net NetR129_2: 56.285,27.86 58.37,30.21
  rectangle net NetR131_2: 56.285,32.36 58.37,34.71

## Silkscreen, mask and mechanical layers (free items; w line width, h text height)
Top Overlay:
  drawing of 34 lines, arcs and shapes, not listed
  text "NRST" at 47.416,67.35 h1.2 r90
  text "GND" at 57.576,67.35 h1.2 r90
  text "SWCLK" at 52.392,67.325 h1 r90
  text "3.3V" at 44.866,67.3 h1.2 r90
  text "SWDIO" at 54.967,67.3 h1 r90
  text "220В" at 5.16,15.875 h2 r90
  text "v1.0" at 114.025,5.196 h2.75
Bottom Overlay:
  drawing of 35 lines, arcs and shapes, not listed
  text "Стенд проверки шлейфов" at 36.5,11 h3
  text "v1.0" at 15.725,0.446 h2.75
PCB out:
  lines w0.15: 0,10.253 0,59.747 10.253,59.747 10.253,70 119.747,70 119.747,59.747 130,59.747 130,10.253 119.747,10.253 119.747,0 10.253,0 10.253,10.253 0,10.253
  lines w0.2: 4.05,20.575 ccw(c4.55,20.575) 4.55,20.075 ccw(c4.55,20.575) 5.05,20.575 5.05,24.825 ccw(c4.55,24.825) 4.55,25.325 ccw(c4.55,24.825) 4.05,24.825 4.05,20.575 ; 5.05,30.325 ccw(c5.55,30.325) 5.55,29.825 ccw(c5.55,30.325) 6.05,30.325 6.05,32.575 ccw(c5.55,32.575) 5.55,33.075 ccw(c5.55,32.575) 5.05,32.575 5.05,30.325 ; 6.95,25.415 ccw(c7.45,25.415) 7.45,24.915 ccw(c7.45,25.415) 7.95,25.415 7.95,27.665 ccw(c7.45,27.665) 7.45,28.165 ccw(c7.45,27.665) 6.95,27.665 6.95,25.415
Коменты:
  lines w0.125: 0,59.747 0,70 10.253,70 ; 119.747,0 130,0 130,10.253
  lines w0.15: 47.05,40.025 47.525,39.55 47.525,38.25 48.35,37.425 51.375,37.425 51.55,37.6 51.55,41.775 52.55,42.775 53.875,42.775 53.875,46.05 47.05,46.05 47.05,40.025
  text "Выводы под программатор неправильные  / SWDIO и SWCLK должны быть 17-18 выводах /  / На 74LVC2G17 неправильно подведенны линии данных" at 28.925,70.777 h4

## Text inside footprints (layer, text, board x,y; h text height)
X1: Top Overlay "1" at 42,3.91 h1.5 r180
X2: Top Overlay "1" at 72.025,3.92 h1.5 r180